# Altium PCB LORAPROJ_.PcbDoc (part 2 of 2)
Units mil, origin at the board's own origin, x right, y up, seen from the top; angles counter-clockwise.
Board outline 1950 x 1800 mil, 4 copper layers (Top Layer, L2 GND, L3 PWR, Bottom Layer), stack 62.45 mil thick; 95 components, 67 nets, 324 pads, 462 vias.
Unrouted connection lines stored in the file: 72.
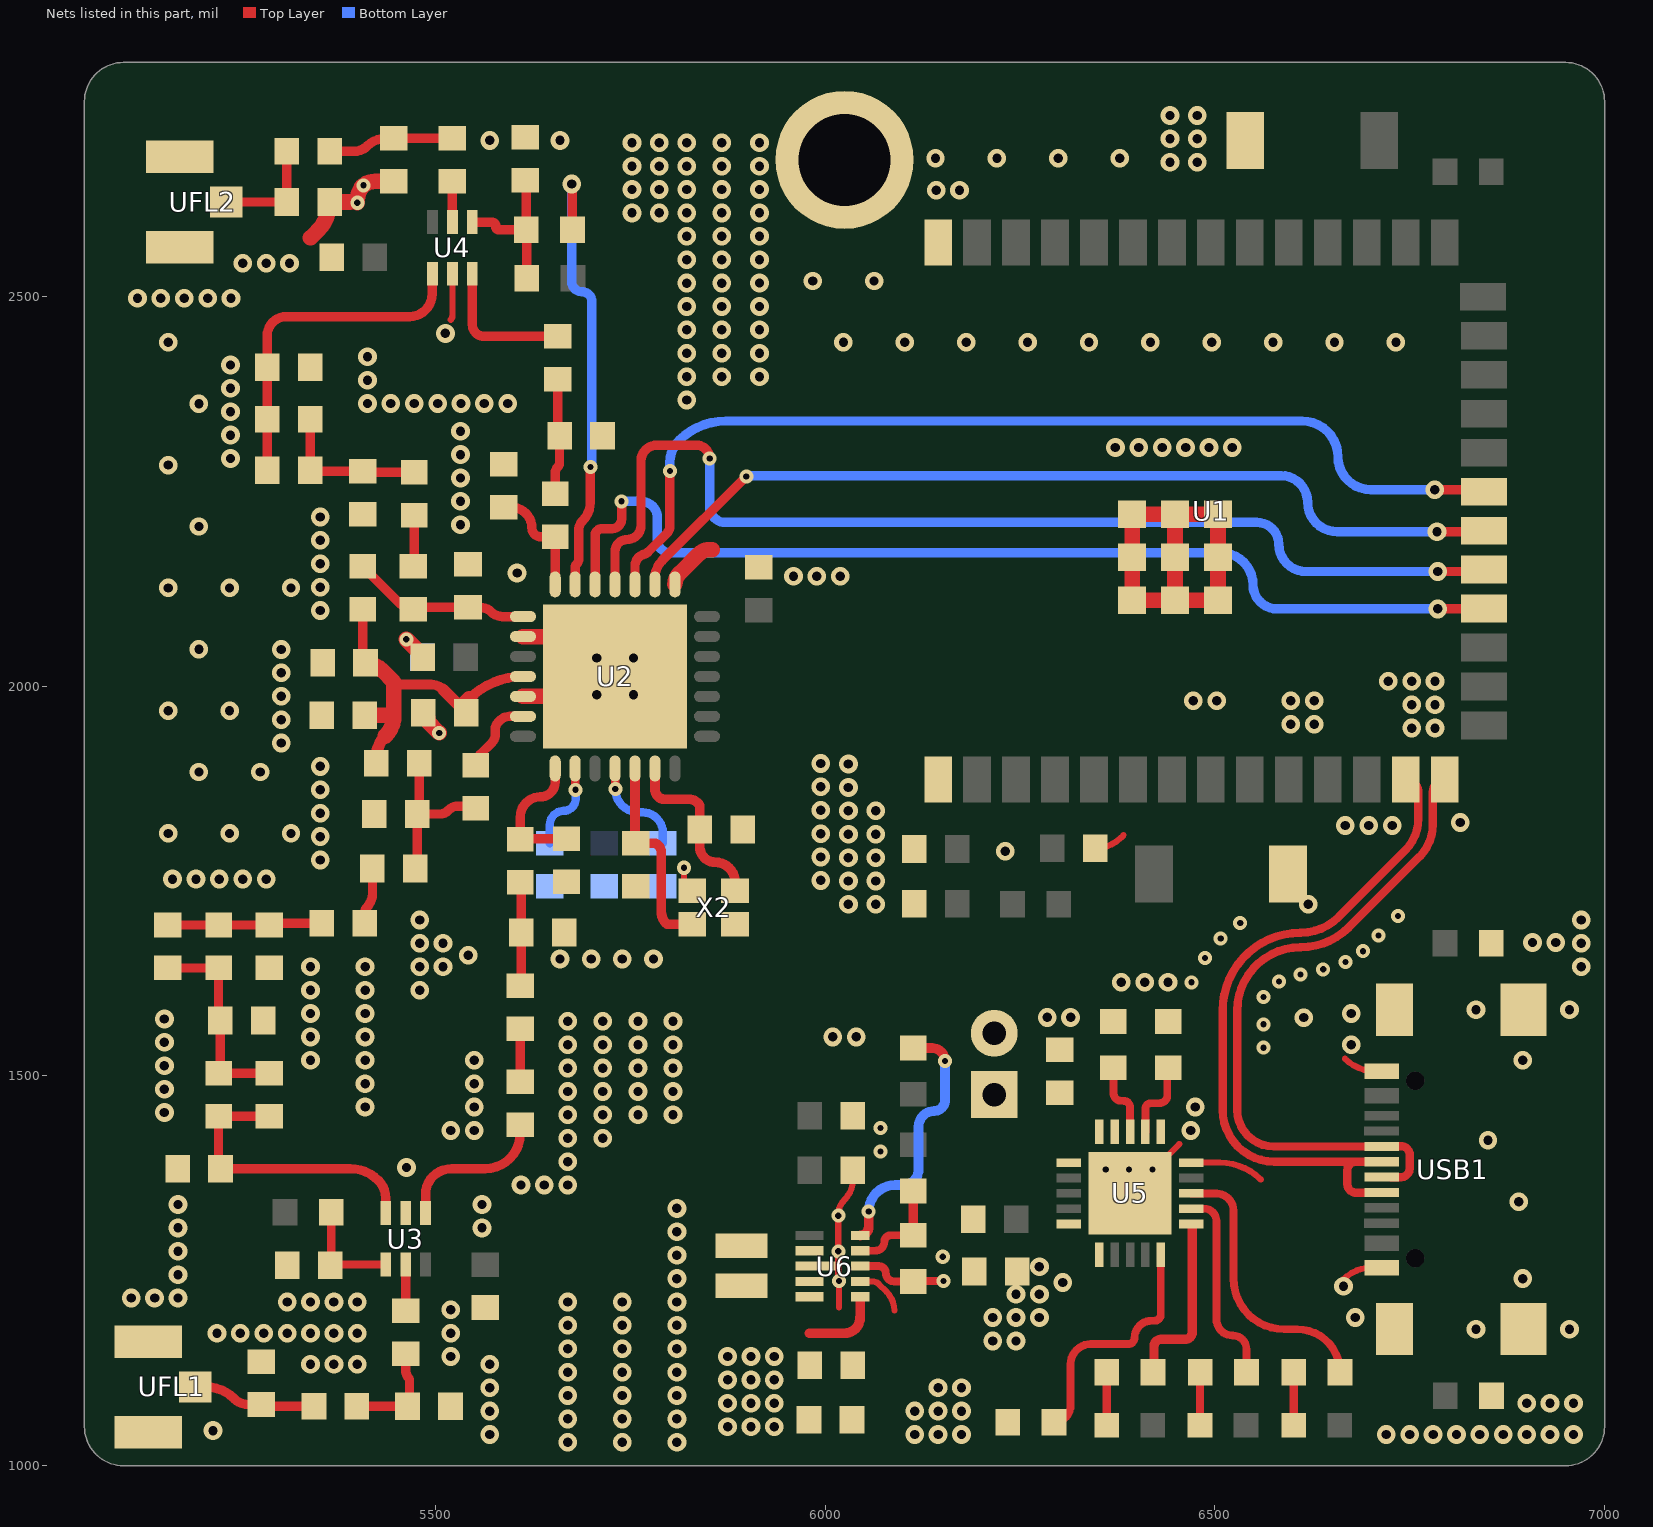
[diagram p4: the nets of this part, all layers, seen from the top]

## Via types
v1: diameter 24, hole 12, Top Layer to Bottom Layer, 362 vias
v2: diameter 23.62, hole 11.81, Top Layer to Bottom Layer, 54 vias
v3: diameter 18, hole 8, Top Layer to Bottom Layer, 46 vias

## Nets (pads, with @x,y where several pads share a name; then routed paths per layer and width w, separated by ;. In a path a pad name is that pad's centre, name@x,y a point inside that pad or via, vN(x,y) a via of type N, cw(c..) or ccw(c..) an arc to the next point about the centre after c; other vN are vias at no path point) (continued)
GND: C1.1 C2.1 C3.2 C4.2 C5.2 C6.1 C7.1 C8.1 C10.1 C11.1 C13.1 C14.1 C15.1 C16.1 C19.1 C20.1 C21.1 C22.1 C23.1 C24.1 C25.1 C26.1 C27.1 C29.1 C30.2 C32.1 C34.2 C35.1 C37.2 C40.2 C41.2 C42.1 C43.1 C44.1 C45.1 C46.1 C47.1 C48.1 C49.1 J1.2 L11.2 pad.4 R6.2 R8.2 R9.2 R13.1 R14.1 R16.1 SW1.1 SW2.1 U1.1 U1.40 U1.41 U2.15 U2.23 U2.26 U2.29 U3.2 U4.2 U5.10 U5.11 U5.21 U6.2 U6.3 U6.8 UFL1.2 UFL1.3 UFL2.2 UFL2.3 USB1.0 USB1.A1B12 USB1.B1A12 X2.2 X2.4 | length 1927
  Top Layer w8: 5520,2470 ccw(c5515.17,2474.83) 5522,2474.83 U4.2@5522,2528.93 ; v3(5819,1767) 5819,1749.4 5818,1749.4 X2.2@5829.44,1737.65 ; U6.8@5988,1256 U6.8@5999,1256 ; 6018,1203 v3(6018,1237) cw(c6020.41,1239.41) 6017,1239.41 v3(6017,1275) 6017,1321.69 cw(c6044.31,1321.69) 6025,1341 ccw(c5999.51,1366.49) 6035.56,1366.49 C47.1@6035.56,1379 ; U6.2@6045.09,1236.32 6060.98,1236.32 cw(c6060.98,1224.98) 6069,1233 6079.1,1222.9 cw(c6055.2,1199) 6089,1199 ; C6.1@6346.56,1792 ccw(c6346.56,1838.93) 6379.75,1805.75 6383,1809 ; U5.21@6391.26,1349.37 6391.26,1351.26 v3(6420,1380) ; U5.21@6420.94,1379.06 6454.41,1412.52 ; U5.10@6470,1388.74 6506.52,1388.74 cw(c6506.52,1314.52) 6559,1367 ; v1@6665,1239 cw(c6701.25,1202.75) 6701.25,1254.02 USB1.A1B12@6714.12,1254.02 ; 6667,1522 ccw(c6705.66,1560.66) 6705.66,1505.99 USB1.B1A12@6714.12,1505.98
  Top Layer w10: U6.3@6045.09,1256 6069,1256 cw(c6069,1247) 6078,1247 ccw(c6088.66,1247) 6088.66,1236.34 R16.1@6113,1236.34 6113.66,1237 v3(6152,1237)
  Top Layer w20: 5340,2575 5349.4,2584.4 ccw(c5312.8,2621) C20.1@5364.56,2621 5390.34,2621 ccw(c5390.34,2634.66) v3@5400,2625 ; v3(5400,2620) 5400,2623.03 cw(c5427.44,2623.03) v3(5408.04,2642.43) ; v3@5405,2640 cw(c5422.96,2622.04) 5422.96,2647.44 C19.1@5447,2647.44 ; v3(5462.85,2060) 5483.88,2038.97 C26.1@5483.88,2037 ; C35.1@5484.44,1966 5490.19,1960.25 5490.19,1954.81 v3(5505,1940) ; U2.26@5612.57,1986.79 5705.03,1986.79 ccw(c5705.03,2012.38) U2.29@5730.62,2012.38 ccw(c5679.44,2012.38) 5679.44,2063.56 U2.23@5612.57,2063.56 ; U2.15@5807.39,2130.43 cw(c5827.39,2130.43) 5813.25,2144.57 5837.82,2169.14 cw(c5851.96,2155) 5851.96,2175 5855,2175 ; U1.41@6448.94,2110.31 U1.41@6448.94,2220.55 ; U1.41@6448.94,2110.31 U1.41@6504.06,2110.31 U1.41@6504.06,2165.43 U1.41@6504.06,2220.55 U1.41@6448.94,2220.55 ; U1.41@6448.94,2110.31 U1.41@6393.82,2110.31 U1.41@6393.82,2165.43 U1.41@6393.82,2220.55 U1.41@6448.94,2220.55
  other v1: 5670,1030 5740,1030 5810,1030 5570,1040 6115,1040 6145,1040 6175,1040 6720,1040 6750,1040 6780,1040 6810,1040 6840,1040 6870,1040 6900,1040 6930,1040 6960,1040 5215,1045 5670,1060 5740,1060 5810,1060 5570,1070 6115,1070 6145,1070 6175,1070 6900,1080 6930,1080 6960,1080 5670,1090 5740,1090 5810,1090 5570,1100 6145,1100 6175,1100 5670,1120 5740,1120 5810,1120 5340,1130 5370,1130 5400,1130 5570,1130 5520,1140 5670,1150 5740,1150 5810,1150 5220,1170 5250,1170 5280,1170 5310,1170 5340,1170 5370,1170 5400,1170 5520,1170 6835,1175 6955,1175 5670,1180 5740,1180 5810,1180 6680,1190 5520,1200 5310,1210 5340,1210 5370,1210 5400,1210 5670,1210 5740,1210 5810,1210 5110,1215 5140,1215 5170,1215 6665,1230 5810,1240 6895,1240 5170,1245 5810,1270 5170,1275 5810,1300 5170,1305 5560,1305 5810,1330 5170,1335 5560,1335 5610,1360 5640,1360 5670,1360 5463.04,1382.43 5670,1390 5670,1420 5715,1420 5520,1430 5550,1430 6469,1430 5670,1450 5715,1450 5760,1450 5805,1450 5152.57,1453.04 5410,1460 5550,1460 6475,1460 5670,1480 5715,1480 5760,1480 5805,1480 5152.57,1483.04 5410,1490 5550,1490 5670,1510 5715,1510 5760,1510 5805,1510 5152.57,1513.04 5340,1520 5410,1520 5550,1520 6895,1520 5670,1540 5715,1540 5760,1540 5805,1540 6675,1540 5152.57,1543.04 5340,1550 5410,1550 6010,1550 6040,1550 5670,1570 5715,1570 5760,1570 5805,1570 5152.57,1573.04 6285,1575 6315,1575 5340,1580 5410,1580 6675,1580 6835,1585 6955,1585 5340,1610 5410,1610 5480,1610 6380,1620 6410,1620 6440,1620 5340,1640 5410,1640 5480,1640 5510,1640 6970,1640 5660,1650 5700,1650 5740,1650 5780,1650 5542.22,1654.71 5480,1670 5510,1670 6970,1670 6907.49,1671.14 6937.49,1671.14 5480,1700 6970,1700 6030,1720 6065,1720 6620,1720 6030,1750 6065,1750 5994.47,1750.75 5163.04,1752.43 5193.04,1752.43 5223.04,1752.43 5253.04,1752.43 5283.04,1752.43 5352.43,1776.96 6030,1780 6065,1780 5994.47,1780.75 6231,1788 5352.43,1806.96 6030,1810 6065,1810 5994.47,1810.75 6667.49,1821.14 6697.49,1821.14 6727.49,1821.14 6815,1825 5352.43,1836.96 6030,1840 6065,1840 5994.47,1840.75 5352.43,1866.96 6030,1870 5994.47,1870.75 5352.43,1896.96 6030,1900 5994.47,1900.75 5302.43,1926.96 6752.49,1946.14 6782.49,1946.14 6597.49,1951.14 6627.49,1951.14 5302.43,1956.96 6752.49,1976.14 6782.49,1976.14 6472.49,1981.14 6502.49,1981.14 6597.49,1981.14 6627.49,1981.14 5302.43,1986.96 6722.49,2006.14 6752.49,2006.14 6782.49,2006.14 5302.43,2016.96 5302.43,2046.96 5352.43,2096.96 5352.43,2126.96 5959.47,2140.75 5989.47,2140.75 6019.47,2140.75 5605,2145 5352.43,2156.96 5352.43,2186.96 5532.43,2206.96 5352.43,2216.96 5532.43,2236.96 5532.43,2266.96 5237.43,2291.96 5532.43,2296.96 6372.49,2306.14 6402.49,2306.14 6432.49,2306.14 6462.49,2306.14 6492.49,2306.14 6522.49,2306.14 5237.43,2321.96 5532.43,2326.96 5237.43,2351.96 5413.04,2362.43 5443.04,2362.43 5473.04,2362.43 5503.04,2362.43 5533.04,2362.43 5563.04,2362.43 5593.04,2362.43 5822.43,2366.96 5237.43,2381.96 5413.04,2392.43 5822.43,2396.96 5867.43,2396.96 5916,2397 5237.43,2411.96 5413.04,2422.43 5822.43,2426.96 5867.43,2426.96 5916,2427 5513.04,2452.43 5822.43,2456.96 5867.43,2456.96 5916,2457 5822.43,2486.96 5867.43,2486.96 5916,2487 5118.04,2497.43 5148.04,2497.43 5178.04,2497.43 5208.04,2497.43 5238.04,2497.43 5822.43,2516.96 5867.43,2516.96 5916,2517 5253.04,2542.43 5283.04,2542.43 5313.04,2542.43 5822.43,2546.96 5867.43,2546.96 5916,2547 5822.43,2576.96 5867.43,2576.96 5916,2577 5752.43,2606.96 5787.43,2606.96 5822.43,2606.96 5867.43,2606.96 5916,2607 6142.49,2636.14 6172.49,2636.14 5752.43,2636.96 5787.43,2636.96 5822.43,2636.96 5867.43,2636.96 5916,2637 5752.43,2666.96 5787.43,2666.96 5822.43,2666.96 5867.43,2666.96 5916,2667 6442.43,2671.96 6477.43,2671.96 5752.43,2696.96 5787.43,2696.96 5822.43,2696.96 5867.43,2696.96 5916,2697 5570,2700 5660,2700 6442.43,2701.96 6477.43,2701.96 6442.43,2731.96 6477.43,2731.96
  other v2: 6889.77,1338.58 6850.4,1417.32 6614.18,1574.8 5157.48,1811.02 5236.22,1811.02 5314.96,1811.02 5196.85,1889.76 5275.59,1889.76 5157.48,1968.51 5236.22,1968.51 5196.85,2047.25 5157.48,2125.99 5236.22,2125.99 5314.96,2125.99 5196.85,2204.73 5157.48,2283.47 5196.85,2362.21 5157.48,2440.95 6023.63,2440.95 6102.37,2440.95 6181.11,2440.95 6259.85,2440.95 6338.59,2440.95 6417.33,2440.95 6496.07,2440.95 6574.81,2440.95 6653.55,2440.95 6732.29,2440.95 5984.26,2519.69 6063,2519.69 6141.74,2677.17 6220.48,2677.17 6299.22,2677.17 6377.96,2677.17
  other v3: 6151,1268 6017,1320.66 6360,1380 6390,1380 6071,1403 6071,1433 6562.49,1536.14 6562.49,1566.14 6562.49,1601.14 6470,1620 6582.49,1621.14 6610,1630 6639.05,1636.68 6667.49,1646.14 6487.49,1651.14 6690,1660 6507.49,1676.14 6710,1680 6532.49,1696.14 6735,1705
MCP_OUT: C23.2 C25.2 C44.2 U5.1 U5.20 U6.1 U6.10 | length 103.1
  Top Layer w12.5: 5980,1170 6025,1170 ccw(c6025,1190) 6045,1190 6045.09,1190 U6.1@6045.09,1216.63
  other v1: 5875,1050 5905,1050 5935,1050 5875,1080 5905,1080 5935,1080 5875,1110 5905,1110 5935,1110 5875,1140 5905,1140 5935,1140 6215,1160 6245,1160 6215,1190 6245,1190 6275,1190 6245,1220 6275,1220 6305,1235 6275,1255
MISO_sx: U1.21 U2.17 | length 1298.4
  Top Layer w12.04: U2.17@5756.21,2130.43 5756.21,2156.21 ccw(c5745.28,2161.27) 5756.67,2157.35 5757.63,2160.14 cw(c5769.01,2156.22) 5757.74,2160.44 cw(c5769.01,2156.22) 5761.34,2165.5 cw(c5774.41,2149.7) 5768.34,2169.28 ccw(c5764.73,2180.77) 5773.24,2172.25 5797.47,2196.49 ccw(c5788.96,2205) 5801,2205 v3(5801,2276) ; v1(6782,2252) 6842.88,2252 cw(c6842.88,2249.49) U1.21@6845.39,2249.49
  Bottom Layer w12.04: v3(5801,2276) 5801,2287 cw(c5840.76,2287) 5812.62,2315.09 cw(c5872.71,2255.08) 5872.71,2340 6612,2340 cw(c6612,2294) 6658,2294 ccw(c6700,2294) 6700,2252 v1(6782,2252)
MOSI_sx: U1.19 U2.18 | length 1390.9
  Top Layer w12.04: U2.18@5730.62,2130.43 5730.62,2172.62 cw(c5746,2172.62) 5746,2188 ccw(c5746,2206) 5764,2206 5764,2289 cw(c5784,2289) 5784,2309 5835,2309 cw(c5835,2292) v3(5852,2292) ; v1(6786,2147) 6842.9,2147 ccw(c6842.9,2149.49) U1.19@6845.39,2149.49
  Bottom Layer w12.04: v3(5852,2292) 5852,2230 ccw(c5872,2230) 5872,2210 6554,2210 cw(c6554,2182) 6582,2182 ccw(c6617,2182) 6617,2147 v1(6786,2147)
NetC4_1: C4.1 U2.2 | length 115.2
  Top Layer w10.64: U2.2@5679.44,1894.33 5679.44,1866.91 v3(5680.04,1866.91)
  Bottom Layer w10.64: C4.1@5647,1798.56 5647,1822 cw(c5665,1822) 5665,1840 ccw(c5665,1855.04) 5680.04,1855.04 v3(5680.04,1866.91)
NetC5_1: C5.1 U2.4 | length 133.1
  Top Layer w10.64: U2.4@5730.62,1894.33 5731,1894.33 v3(5731,1868)
  Bottom Layer w10.64: v3(5731,1868) ccw(c5761,1868) 5761,1838 5766,1838 cw(c5766,1812) 5792,1812 C5.1@5792,1798.56
NetC7_2: C7.2 C8.2 C35.2 L1.1 L2.1 U2.25 | length 465.7
  Top Layer w12.5: L2.1@5407,2098.44 5407,2040.63 ccw(c5424.07,2040.63) C7.2@5412,2028.56 ; L1.1@5424.44,1901 L1.1@5424.44,1908.1 ; 5447,2005 ccw(c5454.24,2012.24) 5454.24,2002 5495,2002 cw(c5495,1981.33) 5509.61,1995.95 ; 5543.96,1983.96 cw(c5612.57,1915.34) U2.25@5612.57,2012.38
  Top Layer w15: L1.1@5424.44,1908.1 cw(c5463.9,1908.1) 5436,1936 ; 5447,2002 5447,2005 ; 5509.61,1995.95 5532.78,1972.78 C35.2@5539.56,1966
  Top Layer w20: C8.2@5409.44,1962.56 5447,1962.56 ; C7.2@5412,2028.56 cw(c5412,2000.94) 5431.53,2020.47 5447,2005 ; 5436,1936 ccw(c5409.44,1962.56) 5447,1962.56 ; 5447,2002 5447,1962.56 ; C35.2@5539.56,1966 5539.56,1979.56 5543.96,1983.96
NetC9_1: C9.1 C10.2 L2.2 U2.22 | length 231.2
  Top Layer w12.04: L2.2@5407,2153.56 5455.13,2105.43 ccw(c5472,2122.29) C9.1@5472,2098.44 cw(c5478.18,2092.26) 5478.18,2101 C10.2@5542,2101 5557.51,2101 cw(c5557.51,2080.51) 5572,2095 ccw(c5586.13,2109.13) 5586.13,2089.15 U2.22@5612.57,2089.15
NetC9_2: C9.2 L3.1 | length 66.1
  Top Layer w12.04: C9.2@5472,2153.56 ccw(c5469.59,2155.97) 5473,2155.97 L3.1@5473,2219.44
NetC11_2: C11.2 C12.1 L3.2 L4.1 | length 199.1
  Top Layer w12.04: L4.1@5339.56,2342 C12.1@5339.56,2277 ccw(c5343.04,2280.48) 5343.04,2275.56 C11.2@5407,2275.56 ccw(c5409.41,2277.97) 5409.41,2274.56 L3.2@5473,2274.56
NetC12_2: C12.2 C13.2 L4.2 U4.1 | length 440.9
  Top Layer w12.04: C12.2@5284.44,2277 L4.2@5284.44,2342 C13.2@5284.44,2409 5284.44,2449.44 cw(c5309,2449.44) 5309,2474 5467,2474 ccw(c5467,2503) 5496,2503 5496,2528.93 U4.1@5496.41,2528.93
NetC14_2: C14.2 L15.1 U2.21 | length 148.8
  Top Layer w12.04: C14.2@5588,2229.44 5597.56,2229.44 cw(c5597.56,2203) 5624,2203 ccw(c5635.56,2203) 5635.56,2191.44 L15.1@5654,2191.44 5653.85,2191.29 U2.21@5653.85,2130.43
NetC15_2: C15.2 C17.2 L15.2 | length 149
  Top Layer w12.04: L15.2@5654,2246.56 5654,2273.76 cw(c5664.24,2273.76) 5657,2281 ccw(c5651.11,2286.89) 5659.44,2286.89 C15.2@5659.44,2321 cw(c5665.33,2326.89) 5657,2326.89 C17.2@5657,2393.44
NetC17_1: C17.1 U4.3 | length 183.3
  Top Layer w12.04: U4.3@5547.59,2528.93 5547.59,2463.65 ccw(c5562.65,2463.65) 5552,2453 ccw(c5562.72,2463.72) 5562.72,2448.56 C17.1@5657,2448.56
NetC18_1: C18.1 U4.5 | length 52.4
  Top Layer w12.04: U4.5@5522,2595.07 C18.1@5522,2647.44
NetC18_2: C18.2 C19.2 L6.1 | length 161.9
  Top Layer w12.04: L6.1@5364.56,2686 5396.1,2686 ccw(c5396.1,2709.9) 5413,2693 cw(c5436.08,2669.92) 5436.08,2702.56 C19.2@5447,2702.56 C18.2@5522,2702.56
NetC20_2: C20.2 L6.2 UFL2.1 | length 142.4
  Top Layer w12.04: UFL2.1@5232.02,2621 C20.2@5309.44,2621 L6.2@5309.44,2686
NetC22_2: C22.2 R1.1 R2.2 U4.4 | length 202.2
  Top Layer w12.5: U4.4@5547.59,2595.07 5571.93,2595.07 cw(c5571.93,2589) 5578,2589 ccw(c5581.72,2589) 5581.72,2585.28 R1.1@5616.79,2585.28 ; C22.2@5615.28,2648.99 cw(c5615.28,2647.49) 5616.79,2647.49 R1.1@5616.79,2585.28 ; R2.2@5617.34,2523 5617.34,2585.28 R1.1@5616.79,2585.28
NetC24_2: C24.2 J1.1 U5.14 U5.15 U5.16
NetC28_1: C28.1 C29.2 L1.2 L7.2 | length 211.7
  Top Layer w12.04: C28.1@5474.56,1766 ccw(c5468.67,1771.89) 5477,1771.89 C29.2@5477,1836 ccw(c5470.83,1842.17) 5479.55,1842.17 L1.2@5479.56,1901 ; C29.2@5479.56,1836 5507,1836 ccw(c5507,1848.07) 5515.54,1839.54 5517,1841 cw(c5529.07,1828.93) 5529.07,1846 L7.2@5552,1846
NetC28_2: C28.2 L8.2 | length 72.6
  Top Layer w12.04: L8.2@5409.56,1696 5409.56,1710.11 cw(c5417.89,1710.11) 5412,1716 ccw(c5394.04,1733.96) 5419.44,1733.96 C28.2@5419.44,1766
NetC30_1: C30.1 C31.1 L8.1 L9.1 | length 198.1
  Top Layer w12.04: C31.1@5157,1693.56 L9.1@5222,1693.56 C30.1@5287,1693.56 cw(c5292.89,1687.67) 5292.89,1696 L8.1@5354.44,1696
NetC31_2: C31.2 C32.2 C33.2 L9.2 L10.2 | length 266.2
  Top Layer w12.04: C31.2@5157,1638.44 L9.2@5222,1638.44 5222,1576.89 ccw(c5230.33,1576.89) C32.2@5224.44,1571 5224.44,1509.45 cw(c5216.11,1509.45) L10.2@5222,1503.56 C33.2@5287,1503.56
NetC33_1: C33.1 C34.1 L10.1 U3.3 | length 384
  Top Layer w12.04: C33.1@5287,1448.44 L10.1@5222,1448.44 5222,1387.18 ccw(c5230.74,1387.18) C34.1@5224.56,1381 5390.79,1381 cw(c5390.79,1329.79) 5427,1366 cw(c5404.28,1343.28) 5436.41,1343.28 U3.3@5436.41,1324.07
NetC36_1: C36.1 C37.1 L12.1 | length 134.5
  Top Layer w12.04: C36.1@5609,1615.56 ccw(c5609,1617) 5610.44,1617 C37.1@5610.44,1684 5610.44,1747 ccw(c5609,1747) L12.1@5609,1748.44
NetC36_2: C36.2 C38.1 | length 67.9
  Top Layer w12.04: C38.1@5609,1492.56 C36.2@5609,1560.44
NetC38_2: C38.2 U3.1 | length 201.2
  Top Layer w12.04: U3.1@5487.59,1324.07 5487.59,1348.28 cw(c5519.72,1348.28) 5497,1371 cw(c5521.14,1346.86) 5521.14,1381 5564,1381 ccw(c5564,1426) 5609,1426 C38.2@5609,1437.44
NetC39_1: C39.1 U3.5 | length 59.4
  Top Layer w12.04: C39.1@5462,1198.56 U3.5@5462,1257.93
NetC39_2: C39.2 C40.1 L13.2 | length 134.3
  Top Layer w12.04: L13.2@5399.56,1076 C40.1@5464.44,1076 ccw(c5458.26,1082.18) 5467,1082.18 5467,1111 cw(c5479.07,1123.07) 5462,1123.07 C39.2@5462,1143.44
NetC41_1: C41.1 L13.1 UFL1.1 | length 159.1
  Top Layer w12.04: UFL1.1@5192.02,1101 5205.79,1101 cw(c5205.79,1049.79) 5242,1086 ccw(c5260.25,1104.25) 5260.25,1078.44 C41.1@5277,1078.44 ccw(c5282.89,1084.33) 5282.89,1076 L13.1@5344.44,1076
NetC42_2: C42.2 R15.2 U3.4 | length 140
  Top Layer w10.64: R15.2@5366.66,1325 5366.66,1258.1 cw(c5365.56,1258.1) C42.2@5365.56,1257 cw(c5366.49,1257) 5366.49,1257.93 U3.4@5436.41,1257.93
NetC48_2: C48.2 U2.5 X2.3 | length 262.2
  Top Layer w12.5: U2.5@5756.21,1894.33 5756.21,1800.46 ccw(c5758.9,1800.46) C48.2@5757,1798.56 5779.82,1798.56 cw(c5779.82,1789.82) 5786,1796 cw(c5776.34,1786.34) 5790,1786.34 5790,1710.49 ccw(c5810.49,1710.49) 5796,1696 ccw(c5799.98,1699.98) 5799.98,1694.35 X2.3@5829.44,1694.35
NetC49_2: C49.2 U2.6 X2.1 | length 229.5
  Top Layer w12.5: U2.6@5781.8,1894.33 5781.8,1868.13 ccw(c5796.13,1868.13) 5786,1858 ccw(c5793.24,1865.24) 5793.24,1855 5824.93,1855 cw(c5824.93,1837.93) 5837,1850 cw(c5831.11,1844.11) 5839.44,1844.11 C49.2@5839.44,1816 5839.44,1793.42 ccw(c5858.42,1793.42) 5845,1780 ccw(c5859.49,1794.49) 5859.49,1774 cw(c5859.49,1748.93) 5884.56,1748.93 X2.1@5884.56,1737.65
NetL7_1: L7.1 U2.27 | length 99.2
  Top Layer w12.04: L7.1@5552,1898.56 cw(c5571.65,1898.56) 5557.76,1912.45 5572.37,1927.07 ccw(c5561.2,1938.24) 5577,1938.24 5577,1945 cw(c5589.07,1945) 5580.54,1953.54 5583,1956 cw(c5595.55,1943.45) 5595.55,1961.2 U2.27@5612.57,1961.2
NetL11_1: L11.1 L12.2 U2.1 | length 175.8
  Top Layer w12.04: L12.2@5609,1803.56 5609,1832 cw(c5635,1832) 5635,1858 ccw(c5635,1876.85) 5653.85,1876.85 U2.1@5653.85,1894.33 ; L12.2@5610,1800 cw(c5619.54,1790.46) 5619.54,1803.95 L11.1@5668.37,1803.95
NetL14_1: L14.1 U6.9
NetL14_2: L14.2 U6.7
NetLED1_1: LED1.1 R5.1 | length 68.2
  Top Layer w10.64: R5.1@6361.34,1120 6361.51,1120 LED1.1@6361.51,1051.99
NetLED2_1: LED2.1 R7.1 | length 68.3
  Top Layer w10.64: LED2.1@6481,1052 6481,1120 R7.1@6481.34,1120
NetLED3_1: LED3.1 R10.1 | length 68.2
  Top Layer w10.64: R10.1@6601.34,1120 6601.34,1051.99 LED3.1@6601.51,1051.99
NetR6_1: R6.1 U5.5 | length 315.1
  Top Layer w10: R6.1@6293.66,1056 ccw(c6293.66,1077.34) 6315,1077.34 6315,1130 cw(c6341,1130) 6341,1156 6389,1156 ccw(c6389,1164) 6397,1164 cw(c6419,1164) 6419,1186 6423,1186 ccw(c6423,1193.63) 6430.63,1193.63 U5.5@6430.63,1270.63
NetR8_1: R8.1 U5.13 | length 95.7
  Top Layer w10: R8.1@6370,1510.34 6370,1478 ccw(c6380,1478) 6380,1468 6383,1468 cw(c6383,1459.74) 6391.26,1459.74 U5.13@6391.26,1428.11
NetR9_1: R9.1 U5.12 | length 103.5
  Top Layer w10: U5.12@6410.95,1428.11 6410.95,1457.95 cw(c6418,1457.95) 6418,1465 6429,1465 ccw(c6429,1475) 6439,1475 6439,1509.34 cw(c6440,1509.34) R9.1@6440,1510.34
NetR11_1: R11.1 U6.5 | length 340.6
  Top Layer w12.5: U6.5@6045.09,1295.37 ccw(c6045.09,1306.28) 6056,1306.28 v3(6056,1326) ; R11.1@6113,1535.66 6137.34,1535.66 cw(c6137.34,1519) v3(6154,1519)
  Bottom Layer w12.5: v3(6056,1326) cw(c6090,1326) 6090,1360 6100,1360 ccw(c6100,1380) 6120,1380 6120,1435 cw(c6140,1435) 6140,1455 ccw(c6140,1469) 6154,1469 v3(6154,1519)
NetR12_1: R12.1 R16.2 U6.4 | length 136
  Top Layer w10: U6.4@6045.09,1275.69 6064.69,1275.69 ccw(c6064.69,1287) 6076,1287 cw(c6084.66,1287) 6084.66,1295.66 R16.2@6113,1295.66
  Top Layer w12.5: R16.2@6113,1295.66 R12.1@6113,1352.34
NSS_sx: U1.18 U2.19 | length 1329.5
  Top Layer w12.04: U2.19@5705.03,2130.43 5705.03,2193.03 cw(c5714,2193.03) 5714,2202 5726.7,2202 ccw(c5726.7,2214.3) 5739,2214.3 v3(5739,2237) ; v1(6786,2099) 6845.39,2099 U1.18@6845.39,2099.49
  Bottom Layer w12.04: v3(5739,2237) 5764,2237 cw(c5764,2216) 5785,2216 5785,2187 ccw(c5801,2187) 5801,2171 6508,2171 cw(c6508,2130) 6549,2130 ccw(c6580,2130) 6580,2099 v1(6786,2099)
PG: R5.2 U5.6 | length 231
  Top Layer w12.04: R5.2@6420.66,1120 ccw(c6420.66,1121.34) 6422,1121.34 6422,1153 cw(c6431,1153) 6431,1162 6462,1162 ccw(c6462,1171) 6471,1171 U5.6@6471,1309
RXTX_RF_sx: R1.2 U2.20 | length 593.6
  Top Layer w12.04: v1(5675,2644) 5675.55,2643.45 5675.55,2585.84 R1.2@5676.11,2585.28 ; U2.20@5679.44,2130.43 5679.44,2152.24 cw(c5684.76,2152.24) 5681,2156 ccw(c5673.76,2163.24) 5684,2163.24 5684,2199.93 cw(c5701.07,2199.93) 5689,2212 ccw(c5664.86,2236.14) 5699,2236.14 v3(5699,2281)
  Bottom Layer w12.04: v1(5675,2644) 5675,2519 ccw(c5688,2519) 5688,2506 cw(c5688,2493) 5701,2493 5701,2283 v3(5699,2281)
SCK_sx: U1.20 U2.16 | length 1174.5
  Top Layer w12.04: U2.16@5781.8,2130.43 5781.8,2138.87 cw(c5813.21,2138.79) 5791,2161 v3(5899,2269) ; v1(6785,2198) 6843.9,2198 ccw(c6843.9,2199.49) U1.20@6845.39,2199.49
  Bottom Layer w12.04: v3(5899,2269) 5900,2270 5939,2270 6585,2270 cw(c6585,2236) 6619,2236 ccw(c6657,2236) 6657,2198 v1(6785,2198)
STAT1: R10.2 U5.8 | length 358.1
  Top Layer w10: U5.8@6470,1349.37 6470,1349 6502,1349 cw(c6502,1327) 6524,1327 6524,1240 ccw(c6589,1240) 6589,1175 ; 6590,1175 6605.66,1175 cw(c6605.66,1120) R10.2@6660.66,1120
STAT2: R7.2 U5.7 | length 257
  Top Layer w10: U5.7@6470,1329.69 6486.31,1329.69 cw(c6486.31,1314) 6502,1314 6502,1188 ccw(c6523,1188) 6523,1167 cw(c6523,1149.34) 6540.66,1149.34 R7.2@6540.66,1120
USB_N: U1.13 USB1.A7 USB1.B7 | length 851.2
  Top Layer w10.64: USB1.B7@6694.06,1350.2 6681.32,1350.13 cw(c6681.26,1361.39) 6670,1361.39 6670,1378.74 cw(c6681.26,1378.74) 6681.26,1390 ; USB1.A7@6694.06,1390 6681.26,1390 ; U1.13@6745,1880 cw(c6745,1864) 6761,1864 6761,1830 cw(c6703.06,1830) 6744.03,1789.03 6658.89,1703.89 cw(c6610,1752.78) 6610,1683.64 ccw(c6610,1583.64) 6510,1583.64 6510,1456.36 ccw(c6576.36,1456.36) 6576.36,1390 6681.26,1390
USB_P: U1.14 USB1.A6 USB1.B6 | length 854.3
  Top Layer w10.64: USB1.B6@6714.13,1409.53 6575.48,1409.53 cw(c6575.48,1456.36) 6528.64,1456.36 6528.64,1583.64 cw(c6610,1583.64) 6610,1665 ccw(c6610,1752.78) 6672.07,1690.71 6762.67,1781.31 ccw(c6721.7,1822.28) 6779.64,1822.28 ; USB1.A6@6725.94,1370 6738.74,1370 ccw(c6738.74,1381.26) 6750,1381.26 6750,1398.61 ccw(c6738.74,1398.61) 6738.68,1409.87 USB1.B6@6725.94,1409.8 ; 6779.64,1822.64 6779.64,1864.64 cw(c6795,1864.64) U1.14@6795,1880
pads on no net: U1.10 U1.11 U1.15 U1.16 U1.22 U1.23 U1.24 U1.25 U1.26 U1.28 U1.29 U1.30 U1.31 U1.32 U1.33 U1.34 U1.35 U1.36 U1.37 U1.38 U1.39 U2.7 U2.28 USB1. USB1.A8 USB1.B8

## Polygon pours and split planes (outlines as drawn)
GND on Top Layer "GND_POUR_MAIN" (solid, pour order 72): 5065,1050 5066.19,1040.94 5069.69,1032.5 5075.25,1025.25 5082.5,1019.69 5090.94,1016.19 5100,1015 6950,1015 6959.06,1016.19 6967.5,1019.69 6974.75,1025.25 6980.31,1032.5 6983.81,1040.94 6985,1050 6985,2750 6983.81,2759.06 6980.31,2767.5 6974.75,2774.75 6967.5,2780.31 6959.06,2783.81 6950,2785 5100,2785 5090.94,2783.81 5082.5,2780.31 5075.25,2774.75 5069.69,2767.5 5066.19,2759.06 5065,2750
GND on Top Layer "GND_L01_P084" (solid, pour order 84): 6745,1190 6745,1250 6705,1250 6705,1190
GND on Top Layer "GND_L01_P082" (solid, pour order 82): 6745,1505 6745,1565 6705,1565 6705,1505
MCP_OUT on Top Layer "MCP_OUT_L01_P016" (solid, pour order 16): 5998,1199 cw(c5996,1199) 5996,1197 ccw(c5996,1192) 5991,1192 5991,1152 5970,1152 5970,1193 ccw(c5967,1193) 5967,1196 5964,1196 cw(c5964,1198) 5962,1198 5962,1212 5998,1212 5962,1212 5998,1212
GND on Top Layer "GND_L01_P081" (solid, pour order 81): 6020,1454.43 6020,1513 6041,1513 6041,1455.43
GND on Top Layer "GND_L01_P080" (solid, pour order 80): 6020,1466 6052.93,1466 cw(c6052.93,1448.93) 6065,1461 6071.29,1454.71 ccw(c6073,1456.41) 6073,1454 cw(c6073,1446.76) 6078.12,1451.88 6085,1445 cw(c6075.34,1435.34) 6089,1435.34 6089,1386 6071.78,1368.78 cw(c6053,1387.56) 6053,1361 6019,1361 ccw(c6016.59,1363.41) 6020,1363.41 6020,1467
NetC24_2 on Top Layer "NETC24_2_L01_P053" (solid, pour order 53): 6305,1443 6320,1443 6320,1392 6306,1392 ccw(c6306,1391) 6305,1391
+3.3 on Top Layer "+3.3_L01_P045" (solid, pour order 45): 6255,1630 ccw(c6255,1640) 6265,1640 6265,1685 ccw(c6260,1685) 6260,1690 cw(c6260,1700) 6250,1700 6250,1705 6230,1705 6230,1700 cw(c6225,1700) 6225,1695 6180,1695 cw(c6180,1700) 6175,1700 6175,1705 6160,1705 6160,1700 cw(c6155,1700) 6155,1695 6150,1695 ccw(c6150,1685) 6140,1685 6140,1635 ccw(c6145,1635) 6145,1630
+3.3 on Top Layer "+3.3_L01_P044" (solid, pour order 44): 6160,1780.5 6160,1727.5 6179,1727.5 6179,1780.5
+3.3 on Top Layer "+3.3_L01_P043" (solid, pour order 43): 6184,1845 6184,1853 6207,1853 6207,1845
+3.3 on Top Layer "+3.3_L01_P042" (solid, pour order 42): 6158,1815 6158,1806 6183,1806 6183,1815
+3.3 on Top Layer "+3.3_L01_P041" (solid, pour order 41): 6178.03,1846.97 6178.03,1842.97 cw(c6154.03,1842.97) 6158,1819.3 6158,1813.97 6186.03,1813.97 ccw(c6186.03,1839.97) 6212.03,1839.97 6212.03,1846.97
+3.3 on Top Layer "g" (solid, pour order 40): 5954,1392.44 5969,1392.44 5969,1365.56 5954,1365.56
+3.3 on Top Layer "g" (solid, pour order 39): 5953,1461.44 5968,1461.44 5968,1434.56 5953,1434.56
+3.3 on Top Layer "+3.3_L01_P038" (solid, pour order 38): 5857,1479 ccw(c5857,1464) 5842,1464 5842,1359 ccw(c5857,1359) 5857,1344 5952,1344 ccw(c5952,1349) 5957,1349 5957,1474 ccw(c5952,1474) 5952,1479
MCP_OUT on Top Layer "g" (solid, pour order 37): 5952,1073.44 5967,1073.44 5967,1046.56 5952,1046.56
MCP_OUT on Top Layer "g" (solid, pour order 33): 5951,1142.44 5966,1142.44 5966,1115.56 5951,1115.56
MCP_OUT on Top Layer "MCP_OUT_L01_P031" (solid, pour order 31): 5855,1160 ccw(c5855,1145) 5840,1145 5840,1040 ccw(c5855,1040) 5855,1025 5950,1025 ccw(c5950,1030) 5955,1030 5955,1155 ccw(c5950,1155) 5950,1160
NetC24_2 on Top Layer "NETC24_2_L01_P028" (solid, pour order 28): 6377,1436 6377,1445.17 ccw(c6370.17,1445.17) 6375,1450 6335.95,1489.05 ccw(c6324,1477.1) 6324,1494 6297.63,1494 cw(c6297.63,1548.63) 6259,1510 ccw(c6254.17,1505.17) 6254.17,1512 6184.41,1512 ccw(c6184.41,1508.59) 6182,1511 ccw(c6186.83,1506.17) 6180,1506.17 6180,1445.83 ccw(c6186.83,1445.83) 6182,1441 ccw(c6186.83,1445.83) 6186.83,1439 6337,1439 cw(c6337,1429.34) 6343.83,1436.17 6344,1436
MCP_OUT on Top Layer "MCP_OUT_L01_P027" (solid, pour order 27): 6317,1300.9 ccw(c6340.9,1300.9) 6324,1284 ccw(c6348.14,1308.14) 6348.14,1274 6357,1274 6357,1255 6353.07,1251.07 cw(c6336,1268.14) 6336,1244 ccw(c6336,1231.94) 6327.46,1240.46 6296.71,1209.71 ccw(c6310.48,1195.93) 6291,1195.93 6291,1186 cw(c6281.35,1186) 6288.17,1179.17 6259.07,1150.07 cw(c6242,1167.14) 6242,1143 6202.24,1143 cw(c6202.24,1153.24) 6195,1146 cw(c6204.66,1155.66) 6191,1155.66 6191,1198 cw(c6195.83,1198) 6192.41,1201.41 6211,1220 ccw(c6189.28,1241.72) 6220,1241.73 6220,1269 cw(c6229.65,1269) 6222.83,1275.83 6224,1277 cw(c6231.24,1269.76) 6231.24,1280 6264.51,1280 ccw(c6264.51,1300.48) 6279,1286 ccw(c6269.35,1295.65) 6283,1295.66 6283,1306 cw(c6296.91,1302.4) 6290,1315 6317,1315 6317,1304
+5 on Top Layer "+5_L01_P024" (solid, pour order 24): 6668,1494 6661.54,1500.46 ccw(c6653,1491.93) 6653,1504 6585.13,1504 ccw(c6585.07,1486.93) 6573,1499 ccw(c6585.07,1486.93) 6568,1486.93 6568,1461.07 ccw(c6585.07,1461.07) 6573,1449 ccw(c6585.07,1461.07) 6585.07,1444 6653,1444 ccw(c6653,1456.07) 6661.54,1447.54 6668,1454
+5 on Top Layer "+5_L01_P023" (solid, pour order 23): 6708,1464 6692.14,1464 ccw(c6692.14,1429.86) 6668,1454 6668,1494 ccw(c6692.14,1518.14) 6692.14,1484 6708,1484
+5 on Top Layer "+5_L01_P022" (solid, pour order 22): 6664,1305 6657.54,1311.46 ccw(c6649,1302.93) 6649,1315 6581.07,1315 ccw(c6581.07,1297.93) 6569,1310 ccw(c6581.07,1297.93) 6564,1297.93 6564,1272.07 ccw(c6581.07,1272.07) 6569,1260 ccw(c6581.07,1272.07) 6581.07,1255 6649,1255 ccw(c6649,1267.07) 6657.54,1258.54 6664,1265
+5 on Top Layer "+5_L01_P021" (solid, pour order 21): 6703.49,1274.82 6687.63,1274.82 ccw(c6687.63,1240.68) 6663.49,1264.82 6663.49,1304.82 ccw(c6687.63,1328.96) 6687.63,1294.82 6703.49,1294.82
+3.3 on Top Layer "+3.3_L01_P017" (solid, pour order 17): 5962,1312 cw(c5964,1312) 5964,1314 ccw(c5964,1319) 5969,1319 5969,1359 5990,1359 5990,1318 ccw(c5993,1318) 5993,1315 5996,1315 cw(c5996,1313) 5998,1313 5998,1299 5962,1299 5998,1299 5962,1299
+3.3 on Top Layer "+3.3_L01_P015" (solid, pour order 15): 5990,1357 5990,1471 5969,1471 5969,1357
MCP_OUT on Top Layer "MCP_OUT_L01_P013" (solid, pour order 13): 5991,1038 5991,1152 5970,1152 5970,1038
NetL14_2 on Top Layer "NETL14_2_L01_P012" (solid, pour order 12): 5937,1270 ccw(c5937,1267) 5934,1267 cw(c5933,1267) 5933,1266 5925,1266 5925,1298 5932,1298 cw(c5932,1296) 5934,1296 ccw(c5948,1296) 5948,1282 5964,1282 5964,1270 5964,1282 5964,1270
NetL14_1 on Top Layer "NETL14_1_L01_P011" (solid, pour order 11): 5949,1230 ccw(c5949,1216) 5935,1216 cw(c5934,1216) 5934,1215 5925,1215 5925,1247 5933,1247 cw(c5933,1244) 5936,1244 ccw(c5938,1244) 5938,1242 5965,1242 5965,1230 5965,1242 5965,1230
+5 on Top Layer "+5_L01_P005" (solid, pour order 5): 6300,1325 6285,1325 ccw(c6285,1310) 6270,1310 6270,1300 cw(c6260,1300) 6260,1290 6225,1290 cw(c6225,1295) 6220,1295 6220,1345 ccw(c6215,1345) 6215,1350 6155,1350 cw(c6155,1355) 6150,1355 6150,1410 cw(c6155,1410) 6155,1415 6270,1415 cw(c6270,1410) 6275,1410 6275,1385 ccw(c6285,1385) 6285,1375 6300,1375 6300,1370
+5 on L3 PWR "+5_L03_P030" (solid, pour order 30): 6590,1250 6590,1170 ccw(c6614.14,1170) 6597.07,1152.93 6630,1120 cw(c6617.93,1107.93) 6635,1107.93 6635,1070 ccw(c6647.07,1070) 6638.54,1061.46 6640,1060 ccw(c6652.07,1072.07) 6652.07,1055 6670,1055 ccw(c6670,1067.07) 6678.54,1058.54 6685,1065 6685,1115 ccw(c6624.64,1115) 6667.32,1157.68 6654.29,1170.71 cw(c6725,1241.42) 6625,1241.42 6625,1250
+3.3 on L3 PWR "+3.3_L03_P068" (solid, pour order 68): 5590,1280 5590,1240 ccw(c5600,1240) 5600,1230 5630,1230 ccw(c5630,1260) 5660,1260 cw(c5690,1260) 5690,1290 5730,1290 ccw(c5730,1330) 5770,1330 cw(c5800,1330) 5800,1360 5940,1360 ccw(c5940,1370) 5950,1370 5950,1400 ccw(c5940,1400) 5940,1410 5770,1410 ccw(c5770,1390) 5750,1390 cw(c5690,1390) 5690,1330 5640,1330 ccw(c5640,1280)
+3.3 on L3 PWR "+3.3_L03_P058" (solid, pour order 58): 5710,1680 5620,1680 cw(c5620,1780) 5520,1780 5520,2050 cw(c5530,2050) 5530,2060 5550,2060 cw(c5550,2050) 5560,2050 5560,1850 ccw(c5660,1850) 5660,1750 5670,1750 ccw(c5670,1770) 5690,1770 5690,1780 5710,1780
+3.3 on L3 PWR "+3.3_L03_P051" (solid, pour order 51): 5860,1590 ccw(c5770,1590) 5770,1680 5710,1680 cw(c5710,1700) 5690,1700 5690,1830 cw(c5700,1830) 5700,1840 5720,1840 cw(c5720,1830) 5730,1830 5730,1780 ccw(c5760,1780) 5760,1750 5890,1750 cw(c5890,1680) 5960,1680
GND on L3 PWR "GND_FILL_L3" (solid, remove dead copper, pour order 85): 5070,1050 5071.02,1042.24 5074.02,1035 5078.79,1028.79 5085,1024.02 5092.24,1021.02 5100,1020 6950,1020 6957.76,1021.02 6965,1024.02 6971.21,1028.79 6975.98,1035 6978.98,1042.24 6980,1050 6980,2750 6978.98,2757.76 6975.98,2765 6971.21,2771.21 6965,2775.98 6957.76,2778.98 6950,2780 5100,2780 5092.24,2778.98 5085,2775.98 5078.79,2771.21 5074.02,2765 5071.02,2757.76 5070,2750
MCP_OUT on L3 PWR "MCP_OUT_L03_P047" (solid, pour order 47): 6320,1245 6320,1225 ccw(c6320,1220) 6315,1220 cw(c6310,1220) 6310,1215 6300,1215 ccw(c6300,1205) 6290,1205 6290,1181 cw(c6284,1181) 6284,1175 6280,1175 ccw(c6280,1160) 6265,1160 cw(c6245,1160) 6245,1140 6145,1140 ccw(c6145,1070) 6075,1070 6075,1035 cw(c6065,1035) 6065,1025 5855,1025 cw(c5855,1040) 5840,1040 5840,1145 cw(c5855,1145) 5855,1160 6055,1160 ccw(c6055,1175) 6070,1175 cw(c6105,1175) 6105,1210 6195,1210 ccw(c6195,1245) 6230,1245 cw(c6260,1245) 6260,1275 6270,1275
+3.3 on L3 PWR "+3.3_L03_P048" (solid, pour order 48): 5860,1440 5960,1440 5960,1520 cw(c6060,1520) 6060,1620 6270,1620 ccw(c6270,1630) 6280,1630 6280,1680 ccw(c6270,1680) 6270,1690 5960,1690 ccw(c5960,1590) 5860,1590
+5 on L3 PWR "+5_L03_P059" (solid, pour order 59): 6435,1065 ccw(c6435,1070) 6440,1070 6440,1285 6405,1285 ccw(c6405,1280) 6400,1280 6400,1070 ccw(c6405,1070) 6405,1065
+5 on L3 PWR "+5_L03_P060" (solid, pour order 60): 6555,1065 ccw(c6555,1070) 6560,1070 6560,1285 6525,1285 ccw(c6525,1280) 6520,1280 6520,1070 ccw(c6525,1070) 6525,1065
+5 on L3 PWR "+5_L03_P064" (solid, pour order 64): 6405,1205 6325,1205 ccw(c6325,1195) 6315,1195 6315,1155 cw(c6310,1155) 6310,1150 6285,1150 ccw(c6285,1140) 6275,1140 6275,1130 ccw(c6285,1130) 6285,1120 6415,1120
+3.3 on L3 PWR "+3.3_L03_P067" (solid, pour order 67): 5855,2160 5865,2160 cw(c5865,2150) 5875,2150 5875,2080 5845,2080 5845,2150 cw(c5855,2150)
+3.3 on L3 PWR "+3.3_L03_P075" (solid, pour order 75): 6260,1690 6260,1620 6335,1620 ccw(c6335,1640) 6355,1640 6355,1660 cw(c6435,1660) 6435,1740 6870,1740 ccw(c6870,1840) 6970,1840 6970,2685 ccw(c6955,2685) 6955,2700 6900,2700 ccw(c6900,2690) 6890,2690 6890,1815 cw(c6865,1815) 6865,1790 6395,1790 ccw(c6395,1725) 6330,1725 cw(c6295,1725) 6295,1690
+5 on L3 PWR "+5_L03_P078" (solid, pour order 78): 6670,1260 cw(c6660,1260) 6660,1250 6350,1250 cw(c6350,1260) 6340,1260 ccw(c6300,1260) 6300,1300 6160,1300 cw(c6160,1310) 6150,1310 6150,1410 cw(c6160,1410) 6160,1420 6300,1420 cw(c6300,1400) 6320,1400 6320,1380 ccw(c6350,1380) 6350,1350 6500,1350 ccw(c6500,1370) 6520,1370 6520,1500 cw(c6530,1500) 6530,1510 6660,1510 cw(c6660,1500) 6670,1500
GND on L2 GND "GND_L02_P069" (solid, pour order 69): 5070,1050 5071.02,1042.24 5074.02,1035 5078.79,1028.79 5085,1024.02 5092.24,1021.02 5100,1020 6950,1020 6957.76,1021.02 6965,1024.02 6971.21,1028.79 6975.98,1035 6978.98,1042.24 6980,1050 6980,2750 6978.98,2757.76 6975.98,2765 6971.21,2771.21 6965,2775.98 6957.76,2778.98 6950,2780 5100,2780 5092.24,2778.98 5085,2775.98 5078.79,2771.21 5074.02,2765 5071.02,2757.76 5070,2750
GND on Bottom Layer "GND_POUR_BOT" (solid, remove dead copper, pour order 77): 5065,1050 5066.19,1040.94 5069.69,1032.5 5075.25,1025.25 5082.5,1019.69 5090.94,1016.19 5100,1015 6950,1015 6959.06,1016.19 6967.5,1019.69 6974.75,1025.25 6980.31,1032.5 6983.81,1040.94 6985,1050 6985,2750 6983.81,2759.06 6980.31,2767.5 6974.75,2774.75 6967.5,2780.31 6959.06,2783.81 6950,2785 5100,2785 5090.94,2783.81 5082.5,2780.31 5075.25,2774.75 5069.69,2767.5 5066.19,2759.06 5065,2750

## Other copper
Bottom Layer:
  region: 152 vertices and 0 holes, not listed, extent 6812.66,2699.31 6849.12,2725.52
  region: 395 vertices and 1 holes, not listed, extent 6881.93,2699.55 6955.99,2755.38
  region: 323 vertices and 0 holes, not listed, extent 6746.14,2699.31 6820.59,2755.57
  region: 6867.99,2755.57 6889.07,2755.53 6889.14,2755.45 6889.19,2755.26 6889.14,2755.07 6888.29,2754.22 6888.05,2753.79 6887.84,2753.53 6887.22,2752.91 6887.15,2752.89 6887.1,2752.8 6885.11,2750.8 6885.01,2750.56 6884.8,2750.3 6881.98,2747.48 6881.83,2747.1 6879.27,2744.53 6879.17,2744.3 6879.13,2744.2 6878.91,2743.94 6876.04,2741.07 6875.9,2740.69 6875.61,2740.64 6875.5,2740.33 6875.33,2740.17 6875.28,2740.07 6873.52,2738.32 6873.48,2738.13 6873.41,2737.96 6873.07,2737.91 6872.96,2737.75 6872.67,2737.22 6870.11,2734.66 6869.99,2734.35 6866.97,2731.34 6866.88,2731.1 6866.74,2730.86 6865.52,2729.65 6865,2729.7 6862.42,2732.29 6862.27,2732.52 6862.18,2732.62 6862.13,2732.71 6862.06,2732.78 6861.99,2732.81 6861.8,2733.14 6858.71,2736.23 6858.66,2736.46 6858.52,2736.61 6858.47,2736.7 6858.4,2736.77 6858.31,2736.82 6858.19,2736.99 6858.09,2737.03 6858.05,2737.13 6857.93,2737.25 6857.86,2737.27 6857.81,2737.37 6857.74,2737.44 6857.64,2737.48 6857.53,2737.65 6857.45,2737.72 6857.38,2737.75 6857.34,2737.84 6857.26,2737.91 6857.17,2737.96 6857.05,2738.13 6856.96,2738.17 6856.91,2738.27 6856.79,2738.39 6856.72,2738.41 6856.67,2738.51 6856.6,2738.58 6856.53,2738.6 6856.48,2738.7 6856.31,2738.86 6856.24,2738.89 6856.2,2738.98 6856.12,2739.05 6856.03,2739.1 6855.93,2739.24 6855.84,2739.29 6855.65,2739.57 6855.53,2739.69 6855.48,2739.88 6853.92,2741.45 6853.89,2741.52 6853.8,2741.57 6853.73,2741.64 6853.68,2741.83 6853.82,2742.07 6854.77,2743.02 6854.91,2743.4 6858.66,2747.15 6858.71,2747.34 6858.85,2747.57 6863.7,2752.42 6863.77,2752.68 6863.98,2752.89 6864.03,2752.99 6866.38,2755.34 6866.45,2755.36 6866.5,2755.45 6866.57,2755.53 6866.76,2755.57 6867.95,2755.57
  region: 180 vertices and 0 holes, not listed, extent 6813.59,2699.31 6888.76,2755.57

## Silkscreen, mask and mechanical layers (free items; w line width, h text height)
Bottom Overlay:
  text "CXD | v1.0.0 | 11/17/2026" at 6960,2570 h60 r90
Mechanical 5:
  lines w10: 5050,1050 ccw(c5100,1050) 5100,1000 5900,1000 6850,1000 6950,1000 ccw(c6950,1050) 7000,1050 7000,2750 ccw(c6950,2750) 6950,2800 5100,2800 ccw(c5100,2750) 5050,2750 5050,1050